# Altium PCB PCB_Autolog.PcbDoc (part 2 of 2)
Units mil, origin at the board's own origin, x right, y up, seen from the top; angles counter-clockwise.
Board outline 3847.36 x 2641.73 mil, 2 copper layers (Top Layer, Bottom Layer); 80 components, 62 nets, 278 pads, 180 vias.
Unrouted connection lines stored in the file: 64.
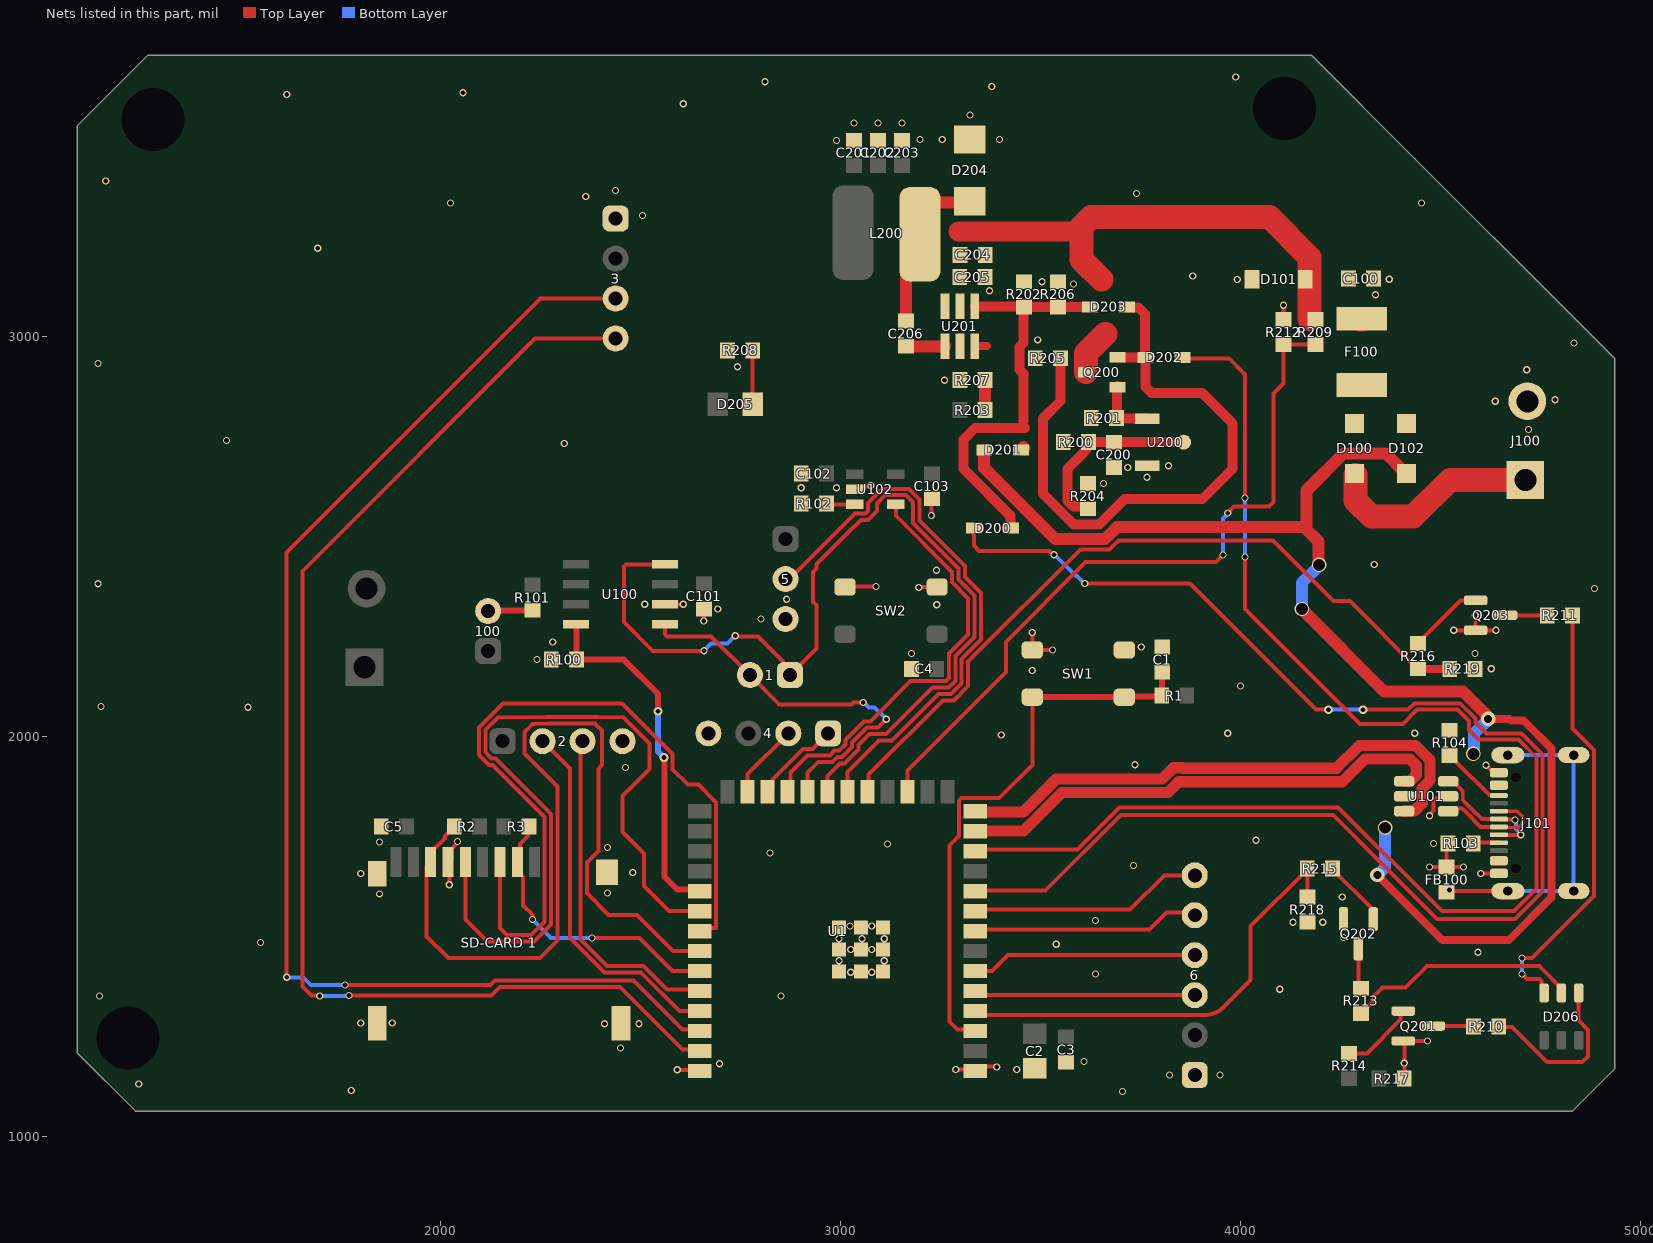
[diagram p2: the nets of this part, all layers, seen from the top]

## Via types
v1: diameter 18, hole 12, Top Layer to Bottom Layer, tented both sides, 162 vias
v2: diameter 22, hole 12, Top Layer to Bottom Layer, tented both sides, 8 vias
v3: diameter 36, hole 30, Top Layer to Bottom Layer, tented both sides, 7 vias
v4: diameter 36, hole 20, Top Layer to Bottom Layer, tented both sides, 2 vias
v5: diameter 37, hole 30, Top Layer to Bottom Layer, tented both sides, 1 vias

## Nets (pads, with @x,y where several pads share a name; then routed paths per layer and width w, separated by ;. In a path a pad name is that pad's centre, name@x,y a point inside that pad or via, vN(x,y) a via of type N, cw(c..) or ccw(c..) an arc to the next point about the centre after c; other vN are vias at no path point) (continued)
CAN_RS: R100.2 U1.31 U100.8 | length 894.3
  Top Layer w15: U100.8@2337.73,2280.71 2338.98,2279.46 R100.2@2338.98,2192.21 2457.39,2192.21 2543.31,2106.3 v2(2543.31,2062.99) ; v2(2557.78,1947.54) 2558.92,1946.4 2558.92,1649.74 2591.73,1616.93 U1.31@2647.64,1616.93
  Bottom Layer w15: v2(2543.31,2062.99) 2543.31,1962.01 v2(2557.78,1947.54)
CAN_RX: 1.1 U1.21 U100.4 | length 2389.2
  Top Layer w10: U100.4@2560.23,2430.71 2463.25,2430.71 2457.39,2424.85 2457.39,2286.7 2529.66,2214.44 v1(2658.21,2214.44) ; v1(2736.22,2251.97) 2737.75,2250.44 2792.87,2250.44 2856.17,2187.14 2856.17,2170.21 1.1@2872.83,2153.54 2939.66,2220.37 2939.66,2328.35 2931.25,2336.75 2931.25,2411.28 2939.66,2419.69 2939.66,2431.73 3015.85,2507.92 3016.4,2507.92 3050.38,2541.9 3068.27,2541.9 3090.55,2564.18 3090.55,2582.68 3111.4,2603.52 3164.01,2603.52 3181.35,2586.18 3181.35,2533.51 3294.72,2420.14 3294.72,2392.51 3334.9,2352.33 3334.9,2248.97 3286.84,2200.91 3286.84,2139.29 3269.85,2122.29 3229.53,2122.29 3113.3,2006.06 3071.95,2006.06 3044.4,1978.5 3044.4,1967.08 3009.69,1932.37 2998.27,1932.37 2967.13,1901.23 U1.21@2967.13,1866.14
  Bottom Layer w10: v1(2658.21,2214.44) 2676.05,2232.28 2716.54,2232.28 v1(2736.22,2251.97)
CAN_TX: 1.2 U1.22 U100.1 | length 973.3
  Top Layer w10: U100.1@2560.23,2280.71 2560.23,2256.3 2566.09,2250.44 2675.94,2250.44 1.2@2772.83,2153.54 2846.32,2080.06 3027.59,2080.06 3032.59,2085.06 3056.43,2085.06 v1(3056.59,2085.22) ; U1.22@2917.13,1866.14 2917.13,1909.45 2944.43,1936.76 2980.03,1936.76 2991.64,1948.37 3003.06,1948.37 3028.4,1973.71 3028.4,1985.13 3065.33,2022.06 3092.92,2022.06 v1(3114.17,2043.31)
  Bottom Layer w10: v1(3056.59,2085.22) 3058.76,2085.22 3071.43,2072.55 3084.93,2072.55 v1(3114.17,2043.31)
FORCE_ON: D200.2 U1.10 | length 3680.4
  Top Layer w10: D200.2@3333.74,2521 3333.74,2477.28 3346.46,2464.57 3523.62,2464.57 v1(3533.6,2454.59) ; U1.10@3336.61,1616.93 3339.37,1614.17 3511.81,1614.17 3700.79,1803.15 4232.28,1803.15 4352.89,1682.54 4354.53,1682.54 4371.52,1665.56 4371.52,1663.91 4492.38,1543.06 4686.95,1543.06 4756.16,1612.27 4756.16,1954.66 4702.95,2007.87 4615.1,2007.87 4588.04,2034.94 4588.04,2044.91 4550.02,2082.93 4435.44,2082.93 4419.44,2066.93 v2(4307.09,2066.93) ; v1(3610.55,2382.39) 3873.52,2382.39 4188.98,2066.93 v2(4220.47,2066.93)
  Bottom Layer w10: v1(3533.6,2454.59) 3535.57,2454.59 3588.65,2401.5 3591.44,2401.5 v1(3610.55,2382.39) ; v2(4220.47,2066.93) v2(4307.09,2066.93)
GND: 2.4 3.1 4.4 5.3 6.1 "SD-CARD 1.6" "SD-CARD 1.10" "SD-CARD 1.11" "SD-CARD 1.12" "SD-CARD 1.13" C1.2 C2.2 C3.2 C4.1 C5.1 C100.1 C101.1 C102.2 C103.2 C200.2 C201.2 C202.2 C203.2 C204.2 C205.2 D101.2 D204.2 FB100.1 J100.2 j101.A1/B12 j101.B1/A12 Q201.2 Q202.2 Q203.2 R100.1 R102.1 R103.1 R104.2 R204.1 R205.1 R206.1 R207.1 R208.2 R212.1 R217.2 R218.1 R219.1 SW1.2 SW2.2 U1.1 U1.40 U1.41 U1.42 U1.43 U1.44 U1.45 U1.46 U1.47 U1.48 U1.49 U100.2 U101.2 U102.2 U200.3 U201.2 | length 1302.6
  Top Layer w10: v1(2020.83,1628.91) 2020.83,1682.92 2017.71,1686.03 2026.49,1694.81 2026.49,1718.43 2039.79,1731.72 2039.79,1735.68 v1(2041.32,1737.21) ; U100.2@2560.23,2330.71 v1(2606.24,2330.71) ; v1(2591,1166) 2641.83,1166 U1.40@2643.83,1164 ; v1(2657.48,2288.63) C101.1@2657.48,2318.9 ; SW2.2@3010.83,2374.02 3011.52,2374.7 3087.89,2374.7 v1(3088.58,2375.39) ; U102.2@3035.43,2618.11 3042.24,2624.92 3070.1,2624.92 3072.87,2627.7 v1(3075.04,2627.7) ; v1(3195.28,2372.77) 3195.9,2373.39 3240.52,2373.39 SW2.2@3241.14,2374.02 ; v1(3226.85,2552.57) 3226.85,2592.98 C103.2@3228.35,2594.48 ; v1(3287.83,1166.93) 3336.61,1166.93 3344.58,1174.9 3388.91,1174.9 v1(3390.58,1173.23) ; v1(3479.33,2260.24) 3479.33,2229.58 3492.38,2216.54 v1(3529.96,2216.54) ; R212.1@4107.48,3043.31 v1(4107.48,3078.71) ; R217.2@4410.04,1144.25 v1(4410.04,1182.75) 4410.04,1235.63 Q201.2@4407.48,1238.19 v1(4468.04,1238.19) ; v1(4472.77,1673.23) FB100.1@4515.75,1673.23 ; v1(4472.77,1801.76) 4472.77,1803.92 4483.09,1814.25 4483.09,1838.98 4489.17,1845.06 4514.35,1845.06 U101.2@4519.69,1850.39 ; R103.1@4519.68,1732.28 4515.75,1728.35 FB100.1@4515.75,1673.23 ; v1(4533.84,2265.75) Q203.2@4588.58,2265.75 ; v1(4558.18,1673.23) FB100.1@4515.75,1673.23 ; v1(4587.68,2303.15) 4587.68,2266.65 Q203.2@4588.58,2265.75 ; v1(4601.24,1657.48) j101.A1/B12@4646.56,1657.48 ; v1(4614.17,1928.25) 4626.72,1915.7 4640.3,1915.7 j101.B1/A12@4646.56,1909.45 ; v1(4639.76,2265.75) Q203.2@4588.58,2265.75
  other v1: 3705,1112 1775.59,1114.17 1244.09,1130.54 3822.83,1152.76 3948.61,1152.76 3440.35,1166.93 2696.85,1181.1 3609,1187 2448.82,1220.47 2409.09,1281.54 2495.7,1281.54 1799.21,1283.46 1877.95,1283.46 1145.67,1350.39 2850.39,1350.39 4098.43,1367.62 3637.8,1405.51 3025,1410 3077.9,1410 2996.06,1439 3109,1439 4594.56,1460.01 3025,1467 3077.9,1467 3539.37,1480.32 1548.42,1484.25 2996.06,1494 3053,1494 3109,1494 4257.87,1496.77 3023,1526 3077.9,1525.98 4131.32,1535.43 4205.82,1535.43 3637.8,1539.37 4254.82,1598.43 1846.46,1606.3 2416.96,1608.32 1799.21,1657.48 2479.95,1659.5 3732.34,1677.17 2822.83,1708.66 2416.6,1722.49 3117.13,1731.06 4483.09,1732.28 1846.46,1735.68 4039.37,1740.16 2461.39,1922.39 3736.22,1929.13 3401.57,2003.94 3968.5,2007.87 4436.18,2007.87 1517,2073 1149.61,2074.8 4000,2125.98 3479.33,2165.35 4627.63,2169.29 2240.16,2192.91 3177.16,2207.54 4586.62,2207.79 3751.91,2223.98 2279.59,2236.28 2801.02,2293.7 2692.32,2318.9 3240.16,2329.6 2509.64,2330.97 2864.85,2343.4 4885.83,2370.08 1141.73,2381.89 3239.94,2415.79 4334.72,2430.28 2901.57,2622.11 2989.54,2622.11 3657.27,2632.72 3766.35,2648.72 3718.41,2673.22 3820.22,2677.22 2308.62,2732.65 1463.62,2740.65 4720.54,2767.72 4637.8,2838.58 4787.4,2842.58 3259.84,2891.22 4716.54,2917.32 2741.65,2925.2 1141.73,2933.07 4834.65,2984.25 3492.87,2992.26 4338.36,3104.87 3372,3115 3582.45,3131.93 3503.94,3137.72 3992,3143 4372.2,3143.89 3880.69,3152.08 1691.62,3221.65 2503.94,3303.15 2023.62,3334.65 4452.76,3334.65 2362.2,3350.67 3740.16,3358.27 2437.01,3366.14 1161.42,3389.76 2989.42,3491.22 3198.27,3493.58 3254.34,3493.58 3397.64,3493.58 3033.27,3535.02 3093.27,3535.02 3153.27,3535.02 3323.27,3555.12 2606.3,3582.68 1614.17,3606.3 2055.12,3610.24 3377.95,3625.98 2811.02,3637.8 3988.19,3649.61
GPIO47: 4.1 U1.24 | length 218.6
  Top Layer w10: U1.24@2817.13,1866.14 2829.84,1878.86 2829.84,1892.65 2905.69,1968.5 2909.45,1968.5 2909.7,1968.76 2929.78,1968.76 4.1@2968.9,2007.87
GPIO48: 4.2 U1.25 | length 183.9
  Top Layer w10: U1.25@2767.13,1866.14 2767.13,1906.1 4.2@2868.9,2007.87
GPIO_5: 6.3 U1.5 | length 555.1
  Top Layer w10: U1.5@3336.61,1366.93 3349.33,1354.21 3365.54,1354.21 3367,1352.76 6.3@3885.83,1352.76
GPIO_6: 6.4 U1.6 | length 565.7
  Top Layer w10: U1.6@3336.61,1412.93 3379.15,1412.93 3418.98,1452.76 6.4@3885.83,1452.76
GPIO_12: 5.2 U1.20 | length 1417.1
  Top Layer w10: 5.2@2862.2,2393.7 2871.72,2393.7 3035.92,2557.9 3061.64,2557.9 3068.08,2564.34 3068.08,2583.83 3103.77,2619.52 3170.64,2619.52 3197.35,2592.81 3197.35,2540.14 3310.72,2426.77 3310.72,2399.14 3350.9,2358.96 3350.9,2242.34 3302.84,2194.28 3302.84,2132.66 3276.47,2106.29 3244.53,2106.29 3128.3,1990.06 3096.35,1990.06 3017.13,1910.83 U1.20@3017.13,1866.14
GPIO_15: 6.5 U1.8 | length 569.3
  Top Layer w10: U1.8@3336.61,1516.93 3772.83,1516.93 3814.96,1559.06 3879.53,1559.06 6.5@3885.83,1552.76
GPIO_16: 6.6 U1.9 | length 581.3
  Top Layer w10: U1.9@3340.12,1566.93 3724.41,1566.93 3810.24,1652.76 6.6@3885.83,1652.76
GREEN_LED: R215.1 R218.2 U1.4 | length 1134.6
  Top Layer w10: U1.4@3336.61,1316.93 3350.73,1302.81 3568.66,1303.44 cw(c3568.78,1262.91) 3575.9,1302.81 3906.55,1302.81 ccw(c3906.55,1382.85) 3948.61,1314.76 4025,1391.14 4025,1525.47 R215.1@4167.32,1667.79 ; R218.2@4167.32,1598.43 R215.1@4167.32,1667.79 ; R215.1@4167.32,1669.29 R215.1@4167.32,1667.79
H_DRIVER: U1.23 U102.4 | length 1077.3
  Top Layer w10: U1.23@2867.13,1866.14 2874.02,1873.03 2874.02,1909.45 2917.32,1952.76 2973.4,1952.76 2985.02,1964.37 2996.43,1964.37 3012.4,1980.34 3012.4,1991.75 3058.7,2038.06 3074.48,2038.06 3174.72,2138.29 3263.22,2138.29 3270.84,2145.92 3270.84,2207.54 3318.9,2255.59 3318.9,2345.71 3278.72,2385.89 3278.72,2411.66 3137.8,2552.57 U102.4@3137.8,2580.71
Net100_2: 100.2 R101.1 | length 111.7
  Top Layer w15: 100.2@2118.11,2313.78 2119.08,2314.75 2228.01,2314.75 R101.1@2228.98,2315.71
NetC1_1: C1.1 R1.1 SW1.1 U1.3 | length 1410.3
  Top Layer w10: U1.3@3336.61,1266.93 3292.13,1266.93 3271.65,1287.4 3271.65,1726.77 3296.09,1751.2 3296.09,1839.2 3302.53,1845.65 3370.7,1845.65 3370.86,1845.49 3396.67,1845.49 3479.33,1928.15 SW1.1@3479.33,2098.43
  Top Layer w15: SW1.1@3479.33,2098.43 SW1.1@3709.65,2098.43 3711.67,2100.45 3800.96,2100.45 R1.1@3802.99,2102.48 3803.74,2103.23 3803.74,2160.23 C1.1@3804.49,2160.98
NetC200_1: C200.1 R200.1 R204.2 U200.2 | length 466.2
  Top Layer w25: R204.2@3618.27,2569.72 3612.9,2575.09 3582.1,2575.09 3566.93,2590.26 3566.93,2669.29 3613.77,2716.13 3613.77,2730.22 R200.1@3619.77,2736.22 3629.92,2736.22 C200.1@3683.27,2736.22 U200.2@3858.27,2736.22
NetC206_1: C206.1 U201.1 | length 97.6
  Top Layer w30: C206.1@3163.27,2976.22 U201.1@3260.85,2976.24
NetC206_2: C206.2 D204.1 L200.1 U201.6 | length 416.9
  Top Layer w30: C206.2@3163.27,3039.22 3163.27,3148.56 3198.27,3183.56 L200.1@3198.27,3256.22 3198.27,3300.92 3233.64,3336.3 3320.71,3336.3 D204.1@3323.27,3338.86
NetD100_1: D100.1 D102.1 F100.2
NetD100_2: D100.2 J100.1 | length 543
  Top Layer w60: D100.2@4288.31,2653.7 4288.31,2589.84 4328.15,2550 4432.24,2550 4523.98,2641.73 J100.1@4712.91,2641.73
NetD200_1: D200.1 D201.1 D203.1 R202.1 R206.2 U201.4 | length 1013.6
  Top Layer w25: U201.4@3335.67,3076.19 3455.36,3076.19 R202.1@3456.8,3074.75 ; D200.1@3426.06,2521 3425.99,2522.28 3424.42,2552.4 3307,2669.82 3307,2742.37 3336.28,2771.65 3460.63,2771.65 ; 3456.8,2789.23 3456.8,2907.99 3447.27,2917.52 3447.27,2974.92 3456.8,2984.45 R202.1@3456.8,3071.22 ; R202.1@3458.27,3074.72 R206.2@3543.27,3074.72 D203.1@3620.08,3074.72
  Top Layer w30: D201.1@3456.8,2724.32 D201.1@3459.9,2721.22
NetD202_1: D202.1 D203.2 Q200.2 R205.2 | length 1594.2
  Top Layer w25: R205.2@3549.77,2946.22 3549.77,2839.07 3505.77,2795.07 3505.77,2607.58 3583.13,2530.22 3646.97,2530.22 3710.6,2593.85 3904.88,2593.85 3980.32,2669.29 3980.32,2783.46 3903.98,2859.8 3777.33,2859.8 3762.69,2874.44 D202.1@3762.69,2948.62 3761.41,2949.9 3761.29,2949.9 3761.29,3057.12 3744.97,3073.44 D203.2@3730.41,3073.44 ; Q200.2@3692.64,2948.62 D202.1@3759.24,2948.62 ; D203.2@3716.08,3073.44 D203.2@3730.41,3073.44 ; D203.2@3729.13,3074.72 D203.2@3730.41,3073.44
NetD205_2: D205.2 R208.1 | length 135.3
  Top Layer w10: D205.2@2779.53,2830.71 2779.84,2831.02 2779.84,2965.39 R208.1@2780.15,2965.7
NetD206_1: D206.1 R210.1 | length 433.9
  Top Layer w10: R210.1@4646.26,1274.17 4647.76,1272.67 4679.8,1272.67 4767.43,1185.04 4854.33,1185.04 4869.27,1199.98 4869.27,1266.17 4846.46,1288.98 D206.1@4846.46,1358.27
NetD206_2: D206.2 R213.1 | length 592.4
  Top Layer w10: R213.1@4301.18,1307.08 4302.68,1307.08 4330.95,1335.35 4330.95,1345.8 4332.18,1347.03 4332.18,1347.93 4356.06,1371.8 4412.86,1371.8 4466.25,1425.2 4696.13,1425.2 4696.44,1425.51 4713.01,1425.51 4713.32,1425.2 4748.03,1425.2 4803.15,1370.08 D206.2@4803.15,1358.27
NetD206_3: D206.3 R211.1 | length 1096.6
  Top Layer w10: v1(4704.72,1405.51) 4716.54,1393.7 4747.73,1393.7 4753.59,1387.84 4753.59,1364.52 D206.3@4759.84,1358.27 ; v1(4704.72,1445.51) 4728.97,1445.51 4884.13,1600.68 4884.13,1966.25 4830.71,2019.67 R211.1@4830.71,2303.15
  Bottom Layer w10: v1(4704.72,1405.51) v1(4704.72,1445.51)
NetFB100_2: FB100.2 j101.0 | length 824
  Top Layer w10: FB100.2@4515.75,1610.23 4518.9,1613.39 j101.0@4669.19,1613.39
  Bottom Layer w10: j101.0@4669.19,1613.39 j101.0@4833.76,1613.39 j101.0@4833.76,1953.54 j101.0@4669.19,1953.54
  other v1: 4522.9,1615.75
Netj101_A5: j101.A5 R103.2 | length 64.7
  Top Layer w10: R103.2@4582.68,1732.28 4584.65,1734.25 j101.A5@4646.56,1734.25
Netj101_B5: j101.B5 R104.1 | length 165.4
  Top Layer w10: R104.1@4523.62,1952.75 4525.12,1952.75 4538.62,1939.25 4538.62,1937.75 4623.11,1853.27 4645.65,1853.27 j101.B5@4646.56,1852.36
NetQ200_1: Q200.1 R201.2 U200.1 | length 156.3
  Top Layer w25: R201.2@3690.24,2795.74 3766.35,2795.74 U200.1@3766.83,2795.26 ; R201.2@3691.2,2797.66 Q200.1@3691.2,2872.39
  Top Layer w30: R201.2@3690.24,2795.74 R201.2@3689.77,2796.22 R201.2@3691.2,2797.66 ; Q200.1@3691.2,2872.39 Q200.1@3692.64,2873.82
NetQ201_1: Q201.1 R214.2 | length 187.5
  Top Layer w10: R214.2@4272.24,1207.25 4316.23,1207.25 4401.02,1292.04 4401.02,1306.53 Q201.1@4407.48,1312.99
NetQ201_3: Q201.3 R210.2 | length 101.6
  Top Layer w10: Q201.3@4482.28,1275.59 4581.85,1275.59 R210.2@4583.26,1274.17
NetQ202_1: Q202.1 R215.2 | length 168.4
  Top Layer w10: R215.2@4230.32,1669.29 4230.32,1667.79 4326.43,1571.69 4326.43,1549.56 Q202.1@4332.68,1543.31
NetQ202_3: Q202.3 R213.2 | length 100.9
  Top Layer w10: Q202.3@4295.28,1468.5 4295.28,1375.99 R213.2@4301.18,1370.08
NetQ203_1: Q203.1 R216.2 | length 190.5
  Top Layer w10: R216.2@4444.88,2232.29 4446.38,2232.29 4459.88,2245.79 4459.88,2249.14 4550.39,2339.65 4587.68,2339.65 Q203.1@4588.58,2340.55
NetQ203_3: Q203.3 R211.2 | length 104.3
  Top Layer w10: Q203.3@4663.39,2303.15 R211.2@4767.71,2303.15
NetR102_2: R102.2 U102.3 | length 71.7
  Top Layer w10: R102.2@2964.57,2582.68 2966.53,2580.71 U102.3@3035.43,2580.71
NetR203_1: R203.1 R207.2 U201.3 | length 105.3
  Top Layer w20: U201.3@3335.8,2976.38 3366.14,2976.38
  Top Layer w30: R203.1@3361.27,2816.22 R207.2@3361.27,2891.22
RED_LED: R216.1 R219.2 U1.19 | length 1905
  Top Layer w10: U1.19@3067.13,1866.14 3070.17,1869.18 3070.17,1904.81 3255.65,2090.29 3283.1,2090.29 3318.84,2126.03 3318.84,2187.66 3599.41,2468.22 3672.65,2468.22 3694.74,2490.32 4081.43,2490.32 4233.16,2338.58 4274.09,2338.58 4443.38,2169.29 R216.1@4444.88,2169.29
  Top Layer w20: R216.1@4444.88,2169.29 R219.2@4523.62,2169.29
RXD: 2.3 U1.36 | length 848.5
  Top Layer w10: 2.3@2354.33,1988.19 2349,1982.86 2349,1492.53 2415.57,1425.95 2506.5,1425.95 2565.52,1366.93 U1.36@2647.64,1366.93
SCL: 3.3 U1.38 | length 3246.3
  Top Layer w10: v1(1614.17,1397.64) 1614.17,2460.63 2249.21,3095.67 3.3@2437.01,3095.67 ; v1(1759.84,1377.95) 2123.81,1377.95 2135.62,1389.76 2481.24,1389.76 2604.07,1266.93 U1.38@2647.64,1266.93
  Bottom Layer w10: v1(1614.17,1397.64) 1654.59,1397.64 1674.28,1377.95 v1(1759.84,1377.95)
SD_CARD: "SD-CARD 1.2" R3.1 U1.35 | length 737.7
  Top Layer w10: R3.1@2220.23,1779.86 2217.8,1777.43 2217.8,1750.72 2198.22,1731.14 2198.22,1693.3 2190.94,1686.03 2190.94,1662.4 2205.47,1647.88 2205.47,1577.66 2228.69,1554.44 2228.69,1542.65 v1(2229.02,1542.32) ; v1(2377.98,1495.81) 2496.34,1495.81 2579.22,1412.93 U1.35@2647.64,1412.93
  Bottom Layer w10: v1(2229.02,1542.32) 2275.52,1495.81 v1(2377.98,1495.81)
SDA: 3.4 U1.39 | length 3142.5
  Top Layer w10: v1(1696.85,1350.39) 1695.32,1351.92 1675.63,1351.92 1653.54,1374.02 1653.54,2413.39 2235.83,2995.67 3.4@2437.01,2995.67 ; v1(1769.66,1351.92) 2125.84,1351.92 2147.68,1373.76 2448.01,1373.76 2604.85,1216.93 U1.39@2647.64,1216.93
  Bottom Layer w10: v1(1696.85,1350.39) 1697.62,1351.16 1768.9,1351.16 v1(1769.66,1351.92)
SEN_ANALOG: R209.1 R212.2 U1.17 | length 1826.1
  Top Layer w10: U1.17@3167.13,1866.14 3167.13,1915.16 3413.39,2161.42 3413.39,2236.95 3612.66,2436.22 3938.6,2436.22 v1(3956.69,2454.32) ; v1(3968.5,2559.06) 3984.25,2574.8 4071.15,2574.8 4082.68,2586.33 4082.68,2858.27 4107.48,2883.07 4107.48,2978.81 4108.98,2980.31 R209.1@4188.98,2980.31
  Bottom Layer w10: v1(3956.69,2454.32) 3956.69,2545.08 3968.5,2556.89 v1(3968.5,2559.06)
SEN_DIGITAL: D202.2 U1.12 | length 3592.8
  Top Layer w10: U1.12@3336.61,1716.93 3591.94,1716.93 3697.84,1822.83 4244.09,1822.83 4503.94,1562.99 4684.26,1562.99 4740.16,1618.89 4740.16,1948.04 4696.32,1991.87 4596.18,1991.87 4572.04,2016.02 4572.04,2038.28 4543.39,2066.93 4442.07,2066.93 4406.64,2031.5 4299.48,2031.5 4011.81,2319.16 v1(4011.81,2448.82) ; D202.2@3855.01,2948.62 3857.41,2946.22 3971.1,2946.22 4011.81,2905.51 v1(4011.81,2596.63)
  Bottom Layer w10: v1(4011.81,2448.82) v1(4011.81,2596.63)
TCK_SCK: "SD-CARD 1.5" U1.32 | length 1981.4
  Top Layer w10: 2061.02,1686.03 2061.02,1542.32 2116.34,1487 2232.24,1487 2275.03,1529.79 2275.03,1805.53 2135.88,1944.69 2126.79,1944.69 2110.83,1960.65 2110.83,2015.73 2139.86,2044.76 2142.79,2047.69 2263.25,2048.19 2392.04,2048.19 2456.35,2047.69 2459.28,2044.76 2521.59,1982.45 2521.59,1919.22 2453.91,1851.55 2453.91,1760.65 2507.87,1706.69 2507.87,1625.98 2570.93,1562.93 U1.32@2647.64,1562.93
TDI_MISO: "SD-CARD 1.7" R2.1 U1.34 | length 2197.6
  Top Layer w10: R2.1@2033.37,1774.6 2009.94,1751.17 2009.94,1745.26 1983.1,1718.43 1974.41,1686.03 1964.39,1676 1964.39,1500.02 2018.4,1446 2248,1446 2291.03,1489.03 2291.03,1874.74 2208.78,1956.99 2208.78,2010.78 2226.12,2028.12 2228.92,2030.92 2232.88,2031.04 2269.72,2032.19 2269.88,2032.19 2385.42,2032.19 2388.35,2029.27 2402.82,2014.79 2402.82,1929.37 2400.66,1926.63 2395.74,1920.44 2393.57,1917.71 2393.57,1914.22 2393.57,1713.27 2365,1684.69 2365,1607.94 2419.55,1553.38 2490.62,1553.38 2581.07,1462.93 U1.34@2647.64,1462.93
TDO_MOSI: "SD-CARD 1.3" U1.33 | length 1957.8
  Top Layer w10: 2147.64,1686.03 2147.64,1520.66 2165.31,1503 2225.61,1503 2259.03,1536.42 2259.03,1798.91 2129.25,1928.69 2120.17,1928.69 2094.83,1954.02 2094.83,2022.35 2155.45,2082.97 2453.46,2082.97 2579.78,1956.65 2579.78,1917.67 2618.12,1879.32 2644.04,1879.32 2688.17,1835.2 2688.17,1520.5 2651.2,1520.5 U1.33@2647.64,1516.93
TXD: 2.2 U1.37 | length 921.2
  Top Layer w10: 2.2@2254.33,1988.19 2323.09,1919.43 2323.09,1495.81 2408.94,1409.95 2499.87,1409.95 2596.89,1312.93 U1.37@2647.64,1312.93
USB_D_N: U1.13 U101.4 | length 1239.6
  Top Layer w28: U1.13@3342.52,1763.78 3457.53,1763.78 3553.4,1859.65 3818.34,1859.65 3845.34,1886.65 4254.7,1886.65 4311.85,1943.8 4423.69,1943.8 4440.09,1927.39 4440.09,1904.2 4423.69,1887.8 U101.4@4409.45,1887.8
USB_D_P: U1.14 U101.6 | length 1390.8
  Top Layer w28: U1.14@3338.58,1811.02 3456.69,1811.02 3539.32,1893.65 3804.26,1893.65 3832.41,1921.8 3855.21,1921.8 3856.36,1920.65 4240.62,1920.65 4297.77,1977.8 4437.78,1977.8 4474.09,1941.48 4474.09,1890.11 4455.04,1871.06 4455.04,1833.05 4436.18,1814.2 4410.65,1814.2 U101.6@4409.45,1812.99
USBC_N: j101.A7 j101.B7 U101.3 | length 318.9
  Top Layer w10: U101.3@4519.69,1887.8 4532.48,1887.8 4556.28,1864 4556.28,1841.22 4577.32,1820.17 4604.19,1793.31 j101.A7@4646.56,1793.31 4647.46,1792.4 4685.85,1792.4 v1(4687.27,1790.98) ; j101.B7@4646.56,1753.94 4646.63,1754.01 4701.46,1754.01 v1(4701.54,1754.08)
  Bottom Layer w10: v1(4687.27,1790.98) 4689.75,1788.5 4689.75,1768.04 4701.54,1756.25 v1(4701.54,1754.08)
USBC_P: j101.A6 j101.B6 U101.1 | length 295.7
  Top Layer w8: j101.A6@4624.02,1773.62 j101.A6@4646.56,1773.62 4648.2,1771.98 4695.14,1771.98 4706.27,1783.11 4706.27,1798.88 4692.16,1812.99 j101.B6@4646.56,1812.99
  Top Layer w10: U101.1@4519.69,1812.99 4532.48,1812.99 4539.41,1819.92 4545.61,1819.92 4546.13,1820.45 4554.42,1820.45 4561.32,1813.55 4601.24,1773.62 j101.A6@4624.02,1773.62
VBUSS: D102.2 D201.2 j101.A4/B9 j101.B4/A9 U101.5 | length 3494.7
  Top Layer w20: v4(4342.52,1653.54) 4505.61,1490.45 4671.11,1490.45 4778.39,1597.73 4778.39,1969.64 4708.66,2039.37 4677.9,2039.37 4673.19,2044.08 v4(4619.9,2044.08)
  Top Layer w30: D201.2@3358.91,2717.28 3358.91,2671.65 3492.72,2537.84 3536.34,2494.22 3661.88,2494.22 3691.28,2523.62 4159.79,2523.62 ; v3(4153.54,2318.9) 4360.15,2112.29 4557.43,2112.29 4614.04,2055.68 4614.04,2051.57 4619.9,2045.71 v4(4619.9,2044.08) ; v3(4196.85,2429.13) 4195.7,2430.28 4195.7,2487.71 4159.79,2523.62 ; D102.2@4414.45,2657.48 4363.4,2708.53 4258.63,2708.53 4165.35,2615.25 4165.35,2529.18 4159.79,2523.62
  Bottom Layer w30: v3(4153.54,2318.9) 4153.54,2384.2 4196.85,2427.51 v3(4196.85,2429.13) ; v4(4342.52,1653.54) 4362.2,1673.23 v3(4362.2,1771.65) ; v3(4582.68,1956.69) 4583.83,1957.84 4583.83,2006.38 4619.9,2042.46 v4(4619.9,2044.08)
VCC: C100.2 C204.1 C205.1 D101.1 F100.1 Q200.3 R200.2 R201.1 R202.2 R209.2 U201.5 | length 1355.3
  Top Layer w50: 3295.33,3262.9 3602.36,3262.9
  Top Layer w60: Q200.3@3613.9,2911.22 3613.9,2958.64 3662.7,3007.44 ; 3652.16,3142.95 3602.36,3192.75 3602.36,3262.9 3602.36,3275.59 3625.98,3299.21 4072.8,3299.21 4173.36,3198.66 R209.2@4173.36,3044.68 ; F100.1@4301.85,3043.31 ccw(c4301.85,3044.68) F100.1@4303.21,3044.68
pads on no net: "SD-CARD 1.1" "SD-CARD 1.8" "SD-CARD 1.9" j101. j101.A8 j101.B8 U1.7 U1.11 U1.15 U1.16 U1.26 U1.28 U1.29 U1.30 U100.5

## Polygon pours and split planes (outlines as drawn)
GND on Bottom Layer "GND_BOT" (solid, remove dead copper, pour order 1): 1070.86,1063 1000,1133.86 1000,3547.24 1157.48,3704.72 4173.23,3704.72 4937.01,2940.94 4937.01,1169.29 4830.72,1063
GND on Top Layer "GND_TOP" (solid, remove dead copper, pour order 0): 1100.15,1070.52 1100.15,3535.07 1277.32,3712.24 4194.76,3712.24 4951,2956 4951,1161.51 4860.01,1070.52

## Keep-outs
Keep-Out Layer:
  lines w30: 4937.01,2940.94 4937.01,1169.29 4830.72,1063 1235.66,1063 1089.65,1209.01 1089.65,3524.06 1270.31,3704.72 4173.23,3704.72 4937.01,2940.94 ; 4937.01,2940.94 4937.01,2940.94

## Other copper
Top Layer:
  region net TDO_MOSI: 2649.61,1500 2692.91,1500 2692.91,1531.5 2645.67,1531.5
  region net 3V3: 1708.66,1807.09 1708.66,1854.33 1822.83,1854.33 1822.83,1807.09
  region net 3V3: 2066.93,1751.78 2173.56,1751.78 2173.56,1845.23 2066.93,1845.23
  region net 3V3: 2637.8,2452.76 2677.17,2452.76 2677.17,2448.82 2677.17,2385.83 2637.8,2385.83
  region net 3V3: 3724.41,1283.46 3787.4,1283.46 3787.4,1236.22 3724.41,1236.22
  region net 3V3: 4751.97,1263.78 4854.33,1263.78 4854.33,1220.47 4751.97,1220.47
  region net GND: 2975.7,1544.92 3126,1544.92 3126,1385.08 2975.7,1385.08
  region net VCC: 4144.95,3166.19 4300.4,3166.19 4300.4,3014 4151.6,3014 cw(c4151.6,3020.34) 4145.25,3020.34
  region net VCC: 3645.67,3030.92 ccw(c3622.57,3064.57) 3662.7,3057.12 3660.95,3104.86 ccw(c3638.75,3092.88) 3638.67,3118.11 cw(c3653.61,3143.2) 3682.07,3149.71 3692.59,3007.36 cw(c3675.84,3006.12) 3675.84,2989.33
  region net NetC206_2: 3271.65,3047.24 3271.65,3106.3 3267.72,3110.24 3149.61,3110.24 3149.61,3027.56 3181.1,3027.56 3181.1,3043.31 3181.1,3047.24 3259.84,3047.24
  region net NetD100_1: 4259.84,2889.76 4354.33,2889.76 4354.33,2881.89 4354.33,2811.02 4440.94,2811.02 4440.94,2759.84 4259.84,2759.84
  region net NetD200_1: 3440.94,2700.79 3476.38,2700.79 3476.38,2814.96 3440.94,2814.96
  region net NetR203_1: 3346.46,2874.02 3377.95,2874.02 3377.95,2988.19 3346.46,2988.19
  region net CAN_RX: 2872.73,2153.54 2880.6,2145.67 2892.41,2145.67 2904.22,2157.48 2904.22,2224.41 2900.29,2228.35 2845.17,2228.35 2845.17,2153.54 2884.54,2153.54
  region net BOOT: 3220.47,2271.65 3259.84,2271.65 3259.84,2161.42 3220.47,2161.42
  region net VCC: 3287.4,3047.24 3307.09,3047.24 3307.09,3255.91 3287.4,3255.91
  region net VCC: 3547.24,2720.47 3574.8,2720.47 3574.8,2775.59 3645.67,2775.59 3645.67,2925.2 3594.49,2925.2 3594.49,2811.02 3586.61,2803.15 3547.24,2803.15 3547.24,2723.62
  region net VCC: 3476.38,3118.11 3437.01,3118.11 3437.01,3234.65 3438.09,3235.73 3438.09,3286.32 3480.12,3286.32
  region net VBUSS: 4421.26,1862.2 4346.46,1862.2 4346.46,1771.65 4358.27,1759.84 4370.08,1759.84 4374.02,1763.78 4374.02,1838.58 4417.32,1838.58 4421.26,1842.52
  region net VBUSS: 4661.42,1877.95 4663.39,1872.05 4625.98,1874.02 4574.8,1918.37 4574.8,1964.57 4578.74,1968.5 4590.55,1968.5 4590.55,1925.2 4637.8,1877.95
  region net VBUSS: 4649.61,1877.95 4728.35,1877.95 4728.35,1688.98 4645.67,1688.98 4645.67,1696.85 4716.54,1696.85 4716.54,1870.08 4649.61,1870.08

## Silkscreen, mask and mechanical layers (free items; w line width, h text height)
Top Overlay:
  drawing of 233 lines, arcs and shapes, not listed
  text "Nath" at 3837.56,3503.41 h140
  text "MR7" at 3795.52,3392.33 h160
  text "I2C" at 2541.5,3356.94 h60 r270
  text "GND" at 2267.72,3287.4 h30
  text "3v3" at 2267.72,3177.17 h30
  text "SCL" at 2267.72,3043.31 h30
  text "GND" at 4730.16,2958.82 h40 r90
  text "SDA" at 2259.84,2940.55 h30
  text "3v3 GPIO12 GND" at 2926.57,2548.7 h25 r270
  text "VCC (12V)" at 4561.18,2478.5 h40
  text "BOOT" at 3061.18,2425.79 h40
  text "L   H" at 1551.31,2346.33 h40 r270
  text "CAN" at 1484.38,2326.65 h40 r270
  text "canH 120ohm" at 2051.06,2141.86 h30 r90
  text "RX" at 2950.94,2128.11 h60
  text "TX" at 2596.61,2124.17 h60
  text "3v3 TXD RXD GND" at 2129.92,2055.12 h25
  text "USBC" at 4806.07,2004.06 h30 r90
  text "RESET" at 3506.06,2002.13 h40
  text "UART" at 1832.83,1962.76 h60
  text "AuToLOG" at 1181,1925.88 h70 r270
  text "GND 3.3sw 48 47" at 2644.8,1908.57 h35
  text "GND  3V3  GPIO5  6  15   16" at 4022.91,1106.3 h70 r90
BoardShape:
  the board outline again, w30

## Dimensions
1070.87,3527.56 to 4951,2956 on BoardShape
1279.17,3724.41 to 1244.53,1047.24 on BoardShape